# Altium PCB BOARD_ADS _V2.0 (3).PcbDoc
Units mm, origin at the board's own origin, x right, y up, seen from the top; angles counter-clockwise.
Board outline 93 x 70 mm, 2 copper layers (Top Layer, Bottom Layer); 49 components, 22 nets, 185 pads, 59 vias.
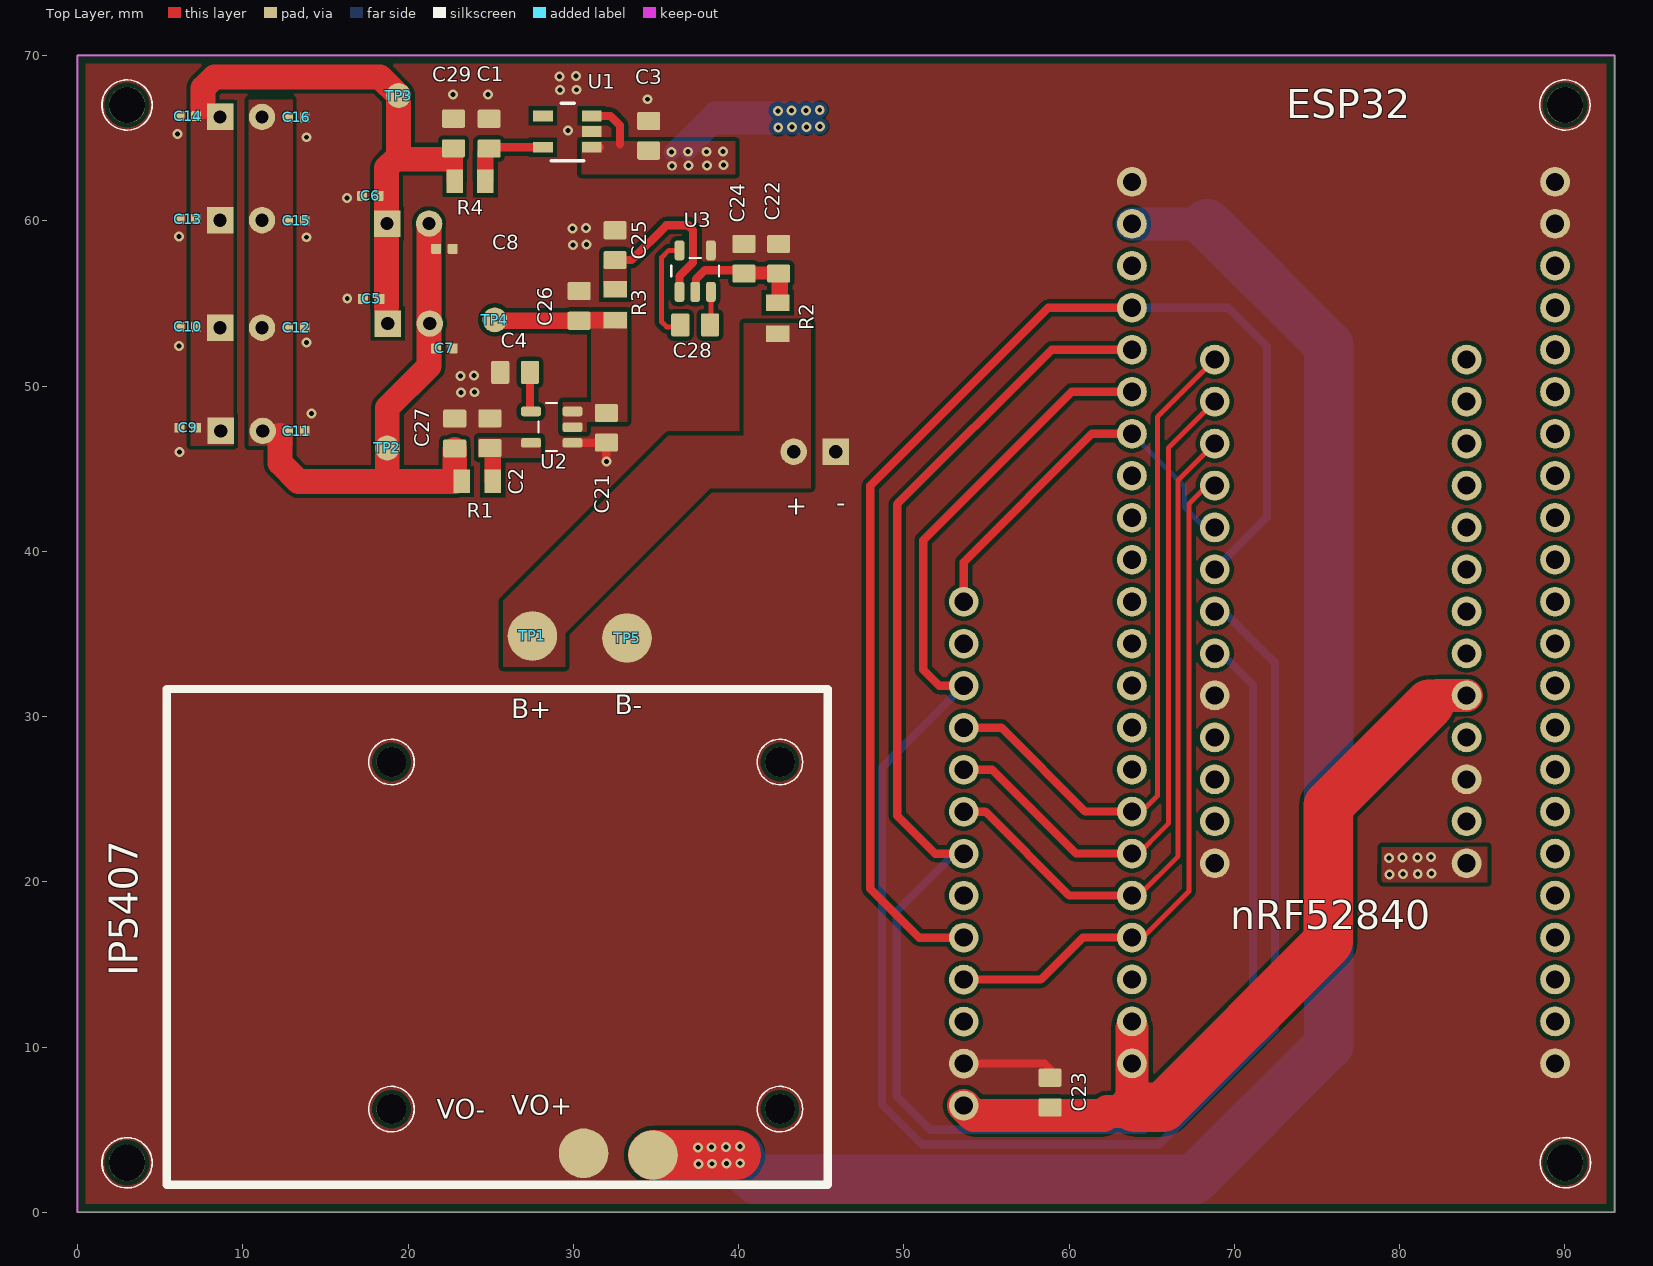
[diagram p0: Top Layer view]
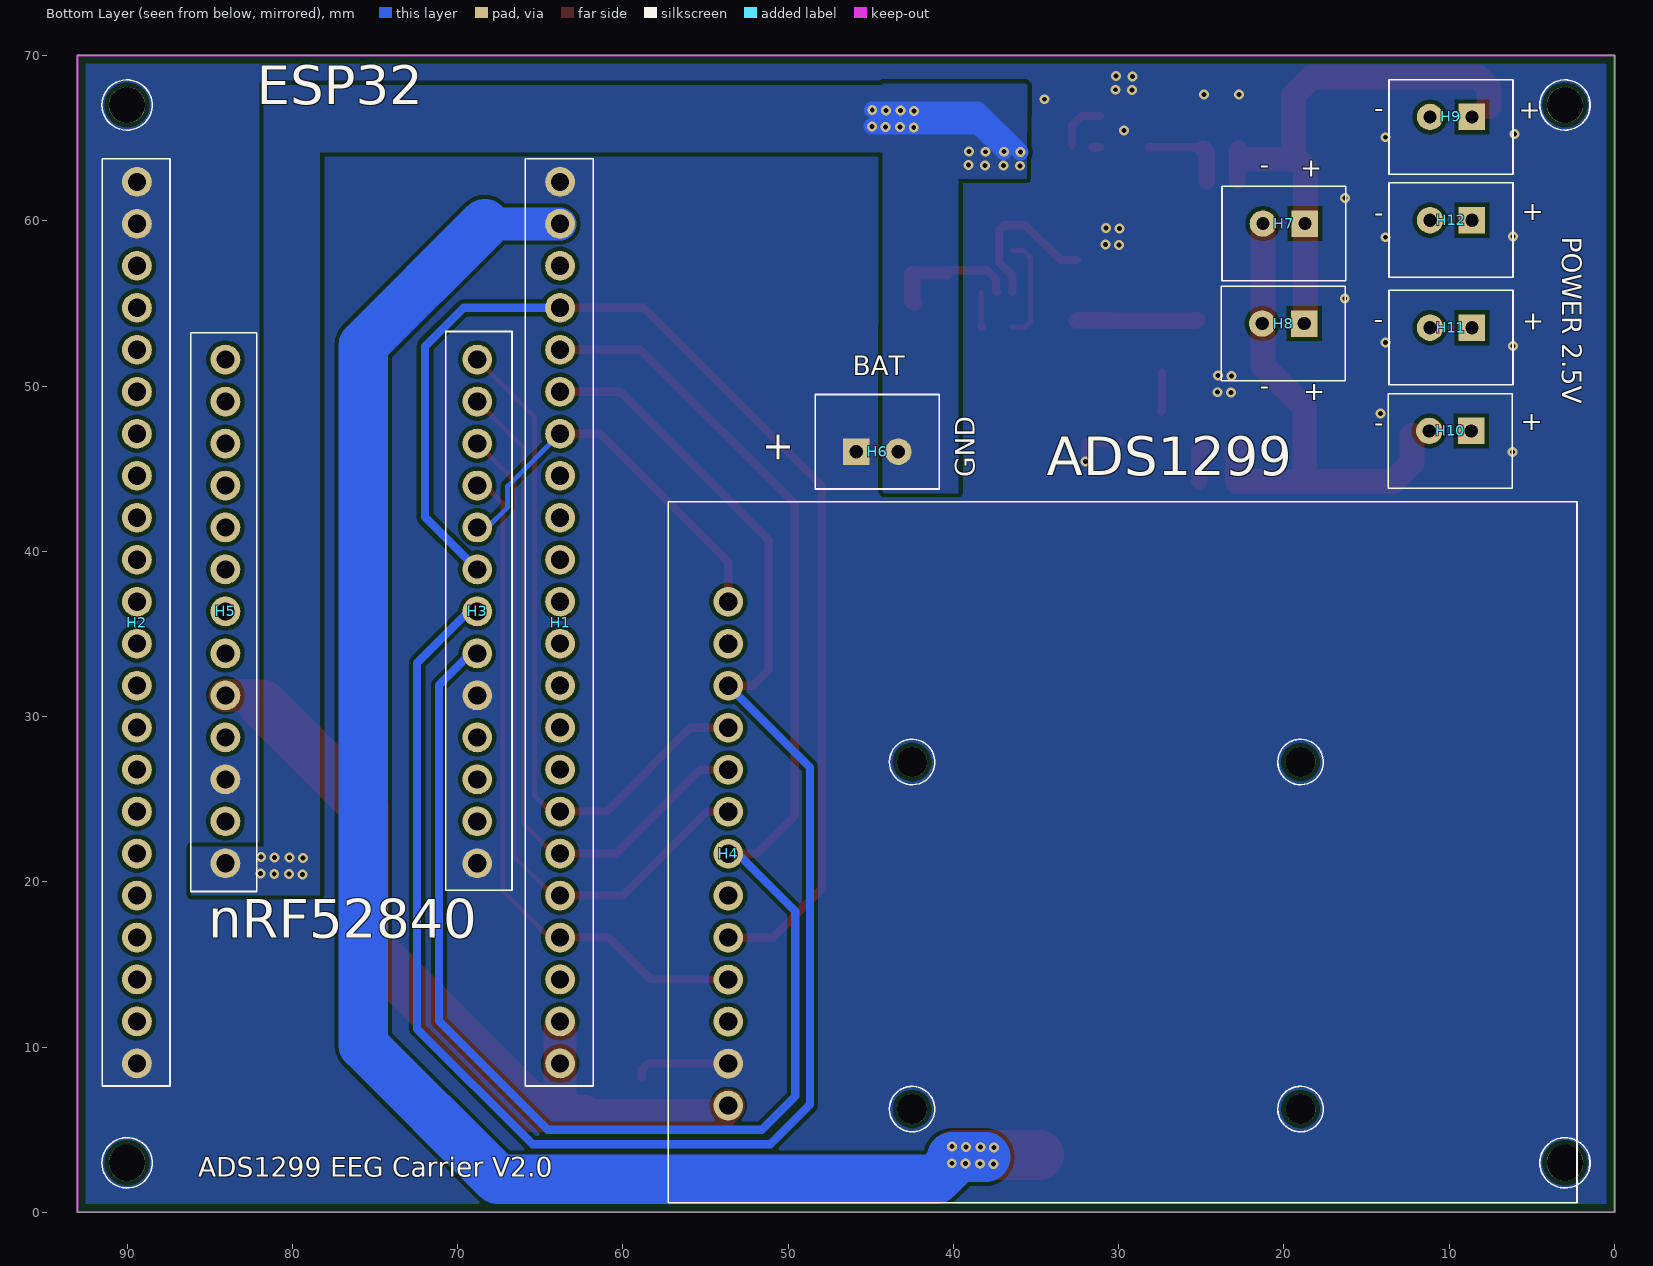
[diagram p1: Bottom Layer view, seen from below]
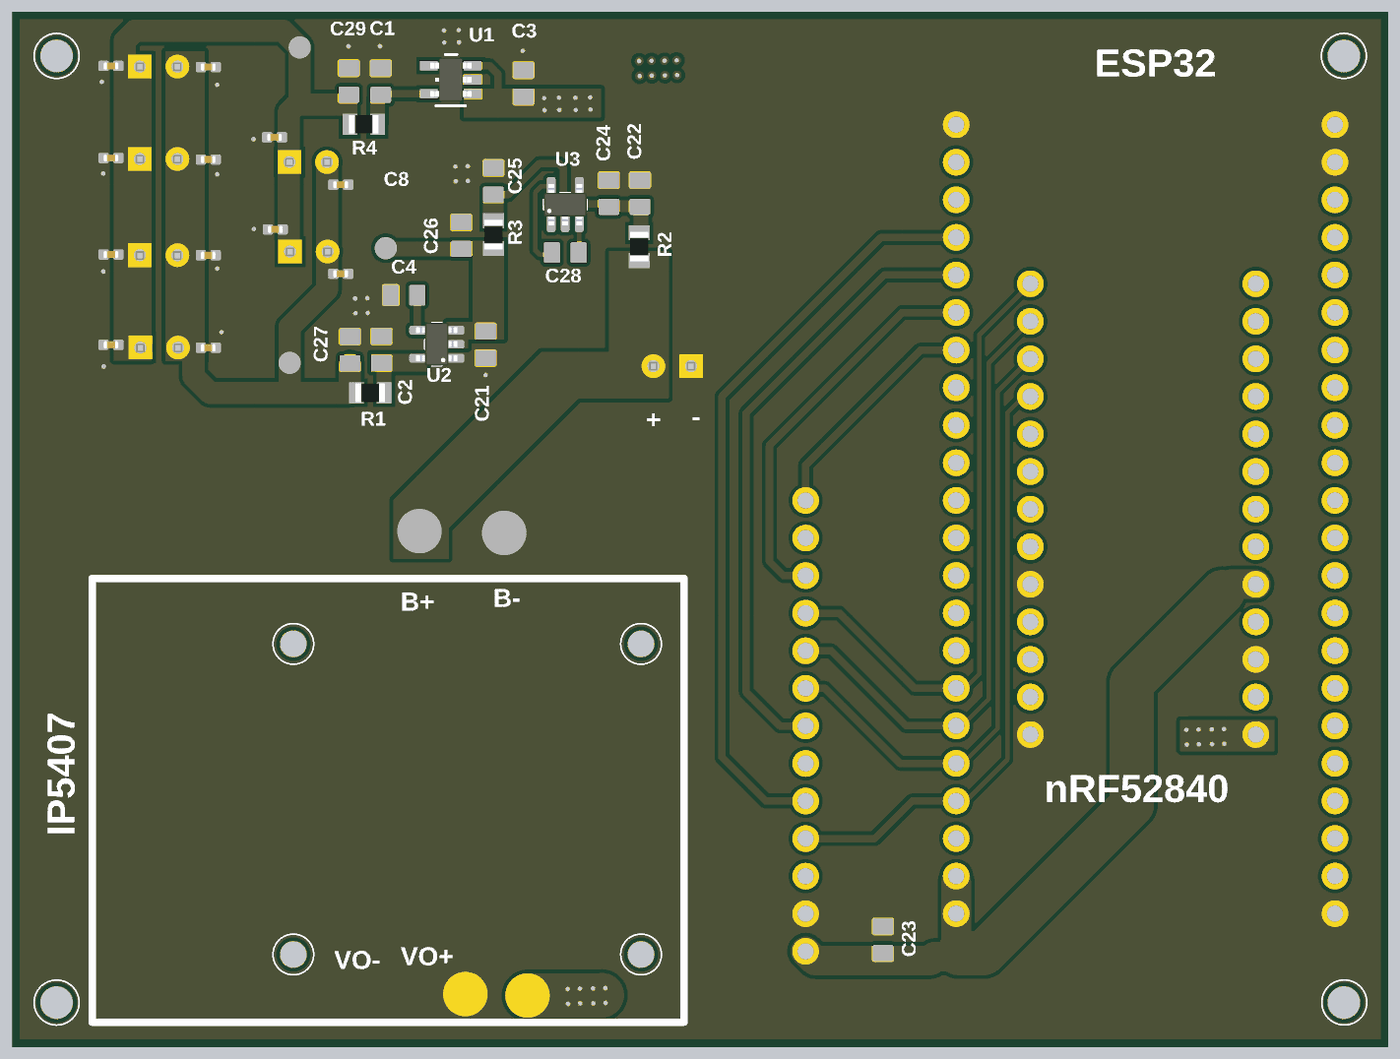
[diagram p2: 3D render of the assembled board from above, using the file's embedded part models]
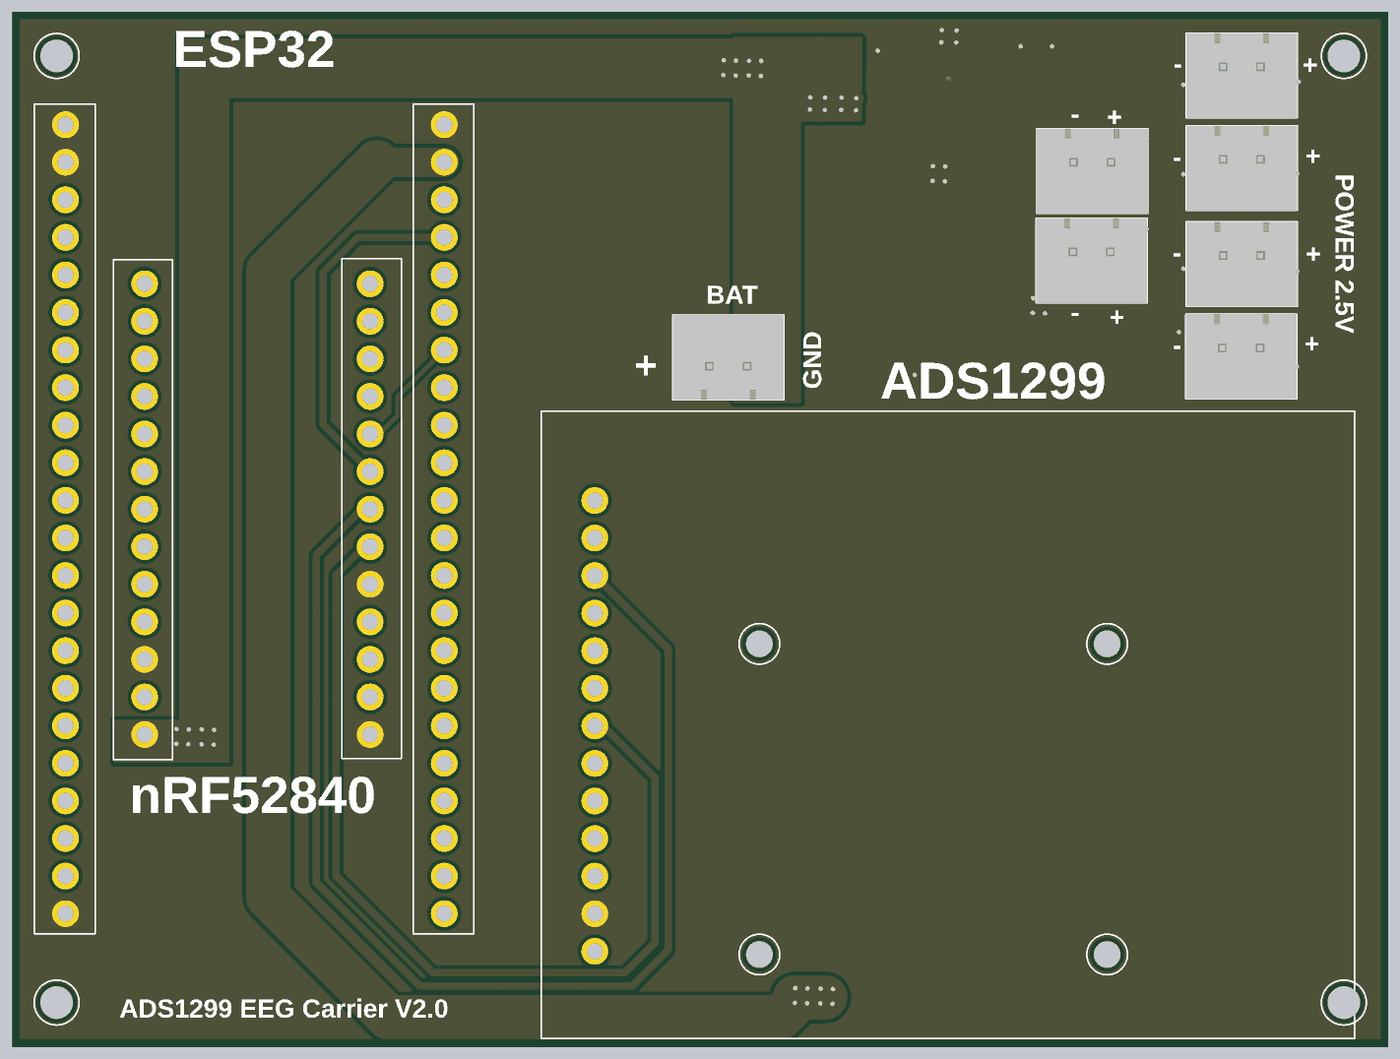
[diagram p3: 3D render of the assembled board from below, using the file's embedded part models]

## Layer stack, top to bottom
Top Solder: solder mask 0.0102, Solder Resist, Dk 3.5
Top Layer: signal copper 0.0356
Dielectric 1: dielectric 0.32, FR-4, Dk 4.8
Bottom Layer: signal copper 0.0356
Bottom Solder: solder mask 0.0102, Solder Resist, Dk 3.5

## Board outline
0,0 0,70 93,70 93,0

## Design rules (kind name [scope] priority, off if disabled: settings)
BoardOutlineClearance [All] p1: gap=0.5 ignorepadtopadclearanceinfootprint=FALSE
Clearance [All] p1: gap=0.254 ignorepadtopadclearanceinfootprint=FALSE except(0.25: Arc-Poly Arc-Region Track-Poly Track-Region SMDPad-Poly SMDPad-Region THPad-Poly THPad-Region Via-Poly Via-Region Fill-Poly Fill-Region Poly-Poly Poly-Region Region-Region; 0.6: Arc-Fill Track-Fill SMDPad-Fill THPad-Fill Via-Fill Fill-Fill)
MinimumSolderMaskSliver [All] p1: minsoldermaskwidth=0.15
PolygonConnect [All] p1: connectstyle=Direct reliefconductorwidth=0.254 reliefentries=4 polygonreliefangle="90 Angle" airgapwidth=0.254
RoutingVias [All] p1: holewidth=0.711 width=1.27 viastyle="Through Hole" minholewidth=0.3 minwidth=0.6 maxholewidth=0.711 maxwidth=1.27
SolderMaskExpansion [All] p1: expansion=0 istentingtop=FALSE
SupplyNets "Schematic Supply Nets_6" [InNet('VBAT_NEG')] p1: voltage=0.000
SupplyNets "Schematic Supply Nets" [InNet('VBAT')] p2: voltage=0.000
SupplyNets "Schematic Supply Nets_5" [InNet('GND')] p3: voltage=0.000
SupplyNets "Schematic Supply Nets_4" [InNet('2V5')] p4: voltage=0.000
SupplyNets "Schematic Supply Nets_3" [InNet('3V3')] p5: voltage=0.000
SupplyNets "Schematic Supply Nets_2" [InNet('-2V5')] p6: voltage=0.000
SupplyNets "Schematic Supply Nets_1" [InNet('5V')] p7: voltage=0.000
Width [All] p1: maxlimit=3 minlimit=0.254 preferedwidth=0.254
29 further rules are at their usual default settings.

## Components (designator, comment, footprint, x,y, rotation, side; value= is the part's Value field where it differs from the comment)
C1 "1uF" C0805L 24.907,65.266 r90 top
C2 "4.7uF" C0805L 24.955,47.141 r90 top
C3 "1uF" C0805L 34.559,65.139 r90 top
C4 "10nF" C0805L 26.479,50.824 r180 top
C5 "100nF" C0402L 17.775,55.275 r0 top
C6 "100nF" C0402L 17.725,61.5 r0 top
C7 "100nF" C0402L 22.2,52.275 r180 top
C8 "100nF" C0402L 22.2,58.3 r180 top
C9 "100nF" C0402L 6.675,47.475 r0 top
C10 "100nF" C0402L 6.675,53.575 r0 top
C11 "100nF" C0402L 13.25,47.275 r180 top
C12 "100nF" C0402L 13.25,53.525 r180 top
C13 "100nF" C0402L 6.675,60.1 r0 top
C14 "100nF" C0402L 6.675,66.325 r0 top
C15 "100nF" C0402L 13.25,60 r180 top
C16 "100nF" C0402L 13.25,66.25 r180 top
C21 "4.7uF" C0805L 32,47.475 r270 top
C22 "10uF" C0805L 42.425,57.7 r90 top
C23 "100nF" C0805L 58.85,7.25 r90 top
C24 "1uF" C0805L 40.325,57.7 r90 top
C25 "1uF" C0805L 32.525,58.525 r90 top
C26 "10uF" C0805L 30.35,54.85 r90 top
C27 "10uF" C0805L 22.825,47.125 r90 top
C28 "1uF" C0805L 37.375,53.7 r0 top
C29 "10uF" C0805L 22.75,65.275 r90 top
H1 "HEADER_22P" header_22p 63.8,62.352 r0 bottom
H2 "HEADER_22P" header_22p 89.4,62.352 r0 bottom
H3 "Header_13p" HEADER_13P 68.81,51.6 r0 bottom
H4 "MODULE ADS" "MODULE ADS1299" 53.625,21.705 r270 bottom
H5 "Header_13p" HEADER_13P 84.05,21.12 r180 bottom
H6 "Header 2P 2.54 Duc Thang" XH2.54M-2 45.875,46.025 r180 bottom
H7 "Header 2P 2.54 Duc Thang" XH2.54M-2 18.735,59.825 r0 bottom
H8 "Header 2P 2.54 Duc Thang" XH2.54M-2 18.775,53.775 r0 bottom
H9 "Header 2P 2.54 Duc Thang" XH2.54M-2 8.627,66.28 r0 bottom
H10 "Header 2P 2.54 Duc Thang" XH2.54M-2 8.667,47.28 r0 bottom
H11 "Header 2P 2.54 Duc Thang" XH2.54M-2 8.627,53.53 r0 bottom
H12 "Header 2P 2.54 Duc Thang" XH2.54M-2 8.627,60.03 r0 bottom
R1 "0R" R0805 24.2,44.225 r180 top
R2 "0R" R0805 42.375,54.1 r90 top
R3 "0R" R0805 32.525,54.925 r270 top
R4 "0R" R0805 23.75,62.375 r180 top
TP1 "TP_?" TP_SMD_1P50#1 27.525,34.875 r90 top
TP2 "TP_?" TP_SMD_1P50#2 18.75,46.25 r90 top
TP3 "TP_?" TP_SMD_1P50#2 19.432,67.575 r90 top
TP4 "TP_?" TP_SMD_1P50#2 25.25,54 r90 top
TP5 "TP_?" TP_SMD_1P50#1 33.25,34.75 r90 top
U1 "LP5907MFX-2.5/NOPB" DBV0005A_M 29.639,65.392 r180 top
U2 "TPS72325DBVR" SOT95P280X145-5N 28.695,47.511 r180 top
U3 "TPS60403DBVR" SOT95P280X145-5N 37.375,56.95 r90 top

## Footprints (in the part's own frame and the unit in brackets; to place one, negate y for a bottom-side part, rotate by r counter-clockwise, add the part's x,y. Pads: shape width x height; smd on the part's side, far side on the other; paste and mask are expansions set on the pad)
C0402L [mm]
  rrect20% 0.6x0.6 smd paste+0.05 mask+0.05: 1(-0.5,0) 2(0.5,0)
  body extent -0.5,-0.25 0.5,0.25, height 0.49
C0805L [mm]
  rrect20% 1.1x1.4 smd mask+0.05: 1(-0.9,0) 2(0.9,0)
  body extent -1.1,-0.72 1.1,0.72, height 1.1
DBV0005A_M [mm]
  rect 1.2x0.65 smd paste+0 mask+0.051: 1(-1.475,0.95) 2(-1.475,0) 3(-1.475,-0.95) 4(1.475,-0.95) 5(1.475,0.95)
  silkscreen extent -0.99,-1.71 0.99,1.77, body extent -1.4,-1.45 1.4,1.45, height 1.2
HEADER_13P [mm]
  round 1.8 hole 1.1 paste-2539.97: 1(0,0) 2(0,2.54) 3(0,5.08) 4(0,7.62) 5(0,10.16) 6(0,12.7) 7(0,15.24) 8(0,17.78) 9(0,20.32) 10(0,22.86) 11(0,25.4) 12(0,27.94) 13(0,30.48)
  silkscreen extent -2.1,-1.7 1.9,32.1
header_22p [mm]
  round 1.8 hole 1.1 paste-2539.97: 1(0,53.34) 2(0,50.8) 3(0,48.26) 4(0,45.72) 5(0,43.18) 6(0,40.64) 7(0,38.1) 8(0,35.56) 9(0,33.02) 10(0,30.48) 11(0,27.94) 12(0,25.4) 13(0,22.86) 14(0,20.32) 15(0,17.78) 16(0,15.24) 17(0,12.7) 18(0,10.16) 19(0,7.62) 20(0,5.08) 21(0,2.54) 22(0,0)
  silkscreen extent -2,-1.4 2.1,54.7
"MODULE ADS1299" [mm]
  round 1.8 hole 1.1 paste-2539.97: 1(15.24,0) 2(12.7,0) 3(10.16,0) 4(7.62,0) 5(5.08,0) 6(2.54,0) 7(0,0) 8(-2.54,0) 9(-5.08,0) 10(-7.62,0) 11(-10.16,0) 12(-12.7,0) 13(-15.24,0)
  silkscreen extent -21.29,-3.64 21.13,51.35, body extent -21.41,-3.56 21.54,51.37, height 9.7
R0805 [mm]
  rect 1x1.42 smd: 1(-0.935,0) 2(0.935,0)
  body extent -1,-0.63 1,0.63, height 0.6
SOT95P280X145-5N [mm]
  rrect50% 1.21x0.59 smd: 1(-1.255,0.95) 2(-1.255,0) 3(-1.255,-0.95) 4(1.255,-0.95) 5(1.255,0.95)
  silkscreen extent -0.33,-1.45 0.8,1.45, body extent -1.4,-1.45 1.4,1.45, height 1.45
TP_SMD_1P50#1 [mm] "Single 1.50 mm round top-layer copper test point for probing"
  round 3 smd: 1(0,0)
TP_SMD_1P50#2 [mm] "Single 1.50 mm round top-layer copper test point for probing"
  round 1.5 smd: 1(0,0)
XH2.54M-2 [mm]
  rect 1.6x1.6 hole 0.8: 1(0,0)
  round 1.6 hole 0.8: 2(2.54,0)
  silkscreen extent -2.48,-2.26 5.02,3.46, body extent -2.48,-2.28 5.02,3.46, height 6.91

## Part data
C1 C2 C3 C4 C5 C6 C7 C8 C9 C10 C11 C12 C13 C14 C15 C16 C21 C22 C23 C24 C25 C26 C27 C28 C29: library part C0805, "CAP 0402 MLCC NON-POLARIZED GENERIC; VALUE TOLERANCE VOLTAGE AND MPN SET ON INSTANCE", Case=0402, Value2=SET_VOLTAGE, Package=0402, Type=Capacitor
H4: library part MODULE_ADS, "Cắm", Chung_Loai=Cắm, Don_Vi=Con, Ma_Hang=MH007094, Ten_Linh_Kien="Header 10P XH2.54-10P Đực Cong"
H6 H7 H8 H9 H10 H11 H12: "Cắm", Chung_Loai=Cắm, Don_Vi=Con, Ma_Hang=MH001283, Ten_Linh_Kien="Header 2P XH2.54-2P Đực Thẳng"
R1 R2 R3 R4: library part R0805, "RES 0805 GENERIC; VALUE TOLERANCE POWER AND MPN SET ON INSTANCE", Case=0805, Value1=SET_VALUE, Package=0805, Type=Resistor
TP1 TP2 TP3 TP4 TP5: library part TEST_POINT, "TP SMD 1P PadDia_1.50mm ROUND COPPER TEST POINT"
U1: library part LP5907MFX-2.5NOPB, "250-mA, low-noise, high-PSRR, ultra-low-dropout voltage regulator with low IQ and enable 5-SOT-23 -40 to 125", Manufacturer_Name="Texas Instruments", Copyright="Copyright (C) 2026 Ultra Librarian. All rights reserved.", Manufacturer_Part_Number=LP5907MFX-2.5/NOPB, RefDes=RefDes, Type=TYPE
U2: "200-mA, negative, adjustable low-dropout voltage regulator with enable", Package="SOT-23-5 Texas Instruments", Check_prices=https://www.snapeda.com/parts/TPS72325DBVR/Texas+Instruments/view-part/?ref=eda, MF="Texas Instruments", MP=TPS72325DBVR, SnapEDA_Link=https://www.snapeda.com/parts/TPS72325DBVR/Texas+Instruments/view-part/?ref=snap
U3: "60mA Charge Pump Voltage Inverter with Fixed 250kHz Operation", Package="SOT-23-5 Texas Instruments", Check_prices=https://www.snapeda.com/parts/TPS60403DBVR/Texas+Instruments/view-part/?ref=eda, MF="Texas Instruments", MP=TPS60403DBVR, SnapEDA_Link=https://www.snapeda.com/parts/TPS60403DBVR/Texas+Instruments/view-part/?ref=snap

## Free pads (board coordinates)
  round 1.8 hole 1.8 paste-2539.97: 8(19,6.25) 8(19,27.25) 8(42.5,6.25) 8(42.5,27.25)
  round 2.2 hole 2.2 paste-2539.97: 9(3,3) 9(3,67) 9(90,3) 9(90,67)
  round 3 smd paste-2539.97: 12(30.625,3.575) 13(34.825,3.475)

## Via types
v1: diameter 0.6, hole 0.3, Top Layer to Bottom Layer, tented both sides, 59 vias

## Nets (pads, with @x,y where several pads share a name; then routed paths per layer and width w, separated by ;. In a path a pad name is that pad's centre, name@x,y a point inside that pad or via, vN(x,y) a via of type N, cw(c..) or ccw(c..) an arc to the next point about the centre after c; other vN are vias at no path point)
2V5: C5.2 C6.2 C9.2 C10.2 C13.2 C14.2 C29.1 H7.1 H8.1 H9.1 H10.1 H11.1 H12.1 R4.2 TP3.1 | length 31.9
  Top Layer w1: C29.1 22.815,64.31 R4.2
  Top Layer w1.5: 7.6,66.9 7.6,68.025 8.275,68.7 18.307,68.7 TP3.1 19.432,63.993 19.7,63.725 ; 18.7,54.775 18.7,63.2 19.225,63.725 19.7,63.725 ; 22.25,63.725 19.7,63.725
3V3: C23.1 H1.1 H1.2 H4.1 H5.5 | length 50.6
  Top Layer w2: H4.1 54.24,5.85 62.075,5.85 62.325,6.1 63.725,6.1 ; H1.2@63.8,11.155 63.8,8.615 63.8,6.525 63.975,6.35 ; 81.8,30.75 82.33,31.28 H5.5
  Top Layer w3: 63.975,6.35 65.65,6.35 75.675,16.375 75.675,24.625 81.8,30.75
5V: H1.21 pad.13 | length 103.7
  Top Layer w3: pad.13 39.825,3.475 39.85,3.5
  Bottom Layer w2: H1.21 68.363,59.812
  Bottom Layer w3: 38.05,3.35 40.1,3.35 ; v1(40.1,2.975) 41.075,2 67.575,2 75.7,10.125 75.7,52.475 68.363,59.812
  other v1: 37.563,2.919 38.388,2.944 39.275,2.95 37.538,3.919 38.363,3.944 39.25,3.95 40.075,3.975
-2V5: C7.2 C8.2 C11.2 C12.2 C15.2 C16.2 C27.1 H7.2 H8.2 H9.2 H10.2 H11.2 H12.2 R1.2 TP2.1 | length 31.3
  Top Layer w1.5: 12.25,47.025 12.25,45.35 13.375,44.225 18.75,44.225 ; H7.2 21.275,51.2 18.75,48.675 TP2.1 18.75,44.225 ; C27.1@22.825,46.15 22.825,44.225 18.75,44.225
CS: H1.16 H3.5 H4.13 | length 24.2
  Top Layer w0.5: H4.13 53.625,39.35 61.387,47.112 H1.16@64.124,47.112
  Bottom Layer w0.3: H1.16 66.975,43.937 66.975,42.675 68.21,41.44 H3.5
DRDY: H1.4 H3.4 H4.4 | length 41.6
  Top Layer w0.3: H1.4 64.457,16.632 67.25,19.425 67.25,42.875 68.355,43.98 H3.4
  Top Layer w0.5: H4.4 58.285,14.085 60.832,16.632 H1.4@64.124,16.632
GND: C1.2 C2.2 C3.2 C4.2 C5.1 C6.1 C7.1 C8.1 C9.1 C10.1 C11.1 C12.1 C13.1 C14.1 C15.1 C16.1 C21.2 C22.2 C23.2 C24.2 C25.2 C26.2 C27.2 C29.2 H1.22 H2.1 H2.21 H2.22 H3.9 H3.13 H4.2 H5.3 H6.1 pad.12 TP5.1 U1.2 U2.1 U3.4 | length 9.1
  Top Layer w0.5: U2.1 31.986,46.561 C21.2 v1(32,45.425) ; H4.2 58.495,9.005 58.85,8.65 C23.2
  other v1: 6.175,46 14.15,48.325 23.2,49.6 24.025,49.625 23.175,50.6 24,50.625 6.15,52.425 13.85,52.625 16.325,55.3 29.975,58.525 30.8,58.55 13.85,59 6.15,59.05 29.95,59.525 30.775,59.55 16.3,61.375 13.85,65.05 6.05,65.25 29.675,65.45 34.5,67.35 22.725,67.65 24.85,67.65 29.2,67.9 30.2,67.925 29.175,68.725 30.175,68.75
MISO: H1.19 H3.6 H4.5 | length 75.8
  Top Layer w0.5: H4.5 50.925,16.625 47.975,19.575 47.975,43.975 58.732,54.732 H1.19@64.124,54.732
  Bottom Layer w0.5: H1.19 69.643,54.732 71.975,52.4 71.975,42.065 H3.6
MOSI: H1.17 H3.7 H4.11 | length 109.5
  Top Layer w0.5: H4.11 52.135,31.865 51.175,32.825 51.175,40.675 60.152,49.652 H1.17@64.124,49.652
  Bottom Layer w0.5: H4.11 48.675,26.915 48.675,6.525 51.075,4.125 65.475,4.125 72.45,11.1 72.45,33.25 69.34,36.36 H3.7
NetC1_1: C1.1 R4.1 U1.5 | length 5.4
  Top Layer w0.5: C1.1 24.983,64.442 U1.5
  Top Layer w1: R4.1 24.685,64.144 C1.1
NetC2_1: C2.1 R1.1 U2.5 | length 2.1
  Top Layer w1: C2.1 25.135,46.061 R1.1
NetC4_1: C4.1 U2.4 | length 2.4
  Top Layer w0.5: C4.1 27.379,48.522 U2.4
NetC22_1: C22.1 C24.1 R2.2 U3.2 | length 7.8
  Top Layer w0.5: U3.2 37.42,55.74 37.42,56.47 37.95,57 40.265,57 C24.1@40.425,56.84
  Top Layer w0.8: C24.1@40.425,56.84 C22.1@42.4,56.84
  Top Layer w1: R2.2 42.49,55.15 C22.1@42.49,56.75
NetC25_1: C25.1 R3.1 U3.1 | length 9.8
  Top Layer w0.5: C25.1 33.525,57.625 35.625,59.725 36.95,59.725 37.25,59.425 37.25,57.474 36.425,56.649 U3.1
NetC28_1: C28.1 U3.5 | length 6.4
  Top Layer w0.3: U3.5 35.78,58.205 35.35,57.775 35.35,53.875 35.65,53.575 C28.1@36.475,53.575
NetC28_2: C28.2 U3.3 | length 2.1
  Top Layer w0.3: C28.2@38.325,53.625 U3.3
  Top Layer w0.5: C28.2@38.275,53.575 C28.2@38.325,53.625
PWDN: H1.7 H3.1 H4.10 | length 42.4
  Top Layer w0.3: H1.7 64.402,24.252 65.35,25.2 65.35,48.14 H3.1
  Top Layer w0.5: H4.10 55.9,29.325 60.973,24.252 H1.7@64.124,24.252
RESET: H1.6 H3.2 H4.9 | length 42.5
  Top Layer w0.3: H1.6@63.8,21.315 66,23.515 66,46.25 H3.2
  Top Layer w0.5: H4.9 55.34,26.785 60.413,21.712 H1.6@64.124,21.712
  Bottom Layer w1: H1.6@63.997,21.712 H1.6@64.124,21.712
SCLK: H1.18 H3.8 H4.7 | length 107.5
  Top Layer w0.5: H4.7 51.895,21.705 49.6,24 49.6,42.85 58.942,52.192 H1.18@64.124,52.192
  Bottom Layer w0.5: H4.7 53.055,21.705 49.575,18.225 49.575,7.025 51.592,5.008 64.558,5.008 71.125,11.575 71.125,31.9 69.205,33.82 H3.8
START: H1.5 H3.3 H4.8 | length 42.3
  Top Layer w0.3: H1.5 64.222,19.172 66.6,21.55 66.6,44.31 H3.3
  Top Layer w0.5: H4.8 54.93,24.245 60.003,19.172 H1.5@64.124,19.172
VBAT: C3.1 H5.1 H6.2 R2.1 TP1.1 U1.1 U1.3 | length 22.7
  Top Layer w0.5: U1.1 U1.1@31.6,64.442 ; U1.3 32.258,66.342 32.825,65.775 32.825,64.628
  Bottom Layer w1: v1(35.95,64.15) 38.506,66.706 v1(44.912,66.706) ; v1(36.95,64.175) 38.481,65.706 v1(44.937,65.706) ; H5.1@83.732,21.438 H5.1
  other v1: 79.381,20.438 80.206,20.463 81.093,20.469 81.918,20.494 79.356,21.438 80.181,21.463 81.068,21.469 81.893,21.494 35.975,63.325 36.975,63.35 38.087,63.349 39.087,63.374 38.062,64.174 39.062,64.199 42.4,65.65 43.225,65.675 44.112,65.681 42.375,66.65 43.2,66.675 44.087,66.681
VBAT_NEG: C21.1 C26.1 R3.2 TP4.1 U2.2 U2.3 | length 7.2
  Top Layer w1: TP4.1 25.3,53.95 C26.1 ; C26.1@30.41,53.99 R3.2
pads on no net: H1.3 H1.8 H1.9 H1.10 H1.11 H1.12 H1.13 H1.14 H1.15 H1.20 H2.2 H2.3 H2.4 H2.5 H2.6 H2.7 H2.8 H2.9 H2.10 H2.11 H2.12 H2.13 H2.14 H2.15 H2.16 H2.17 H2.18 H2.19 H2.20 H3.10 H3.11 H3.12 H4.3 H4.6 H4.12 H5.2 H5.4 H5.6 H5.7 H5.8 H5.9 H5.10 H5.11 H5.12 H5.13 U1.4

## Polygon pours and split planes (outlines as drawn)
GND on Top Layer "GND_L01_P015" (solid, remove dead copper, pour order 15): 0,70 0,40.048 0,-0.01 92.992,-0.01 93,-0.002 93,69.948
-2V5 on Top Layer "-2V5_L01_P036" (solid, remove dead copper, pour order 36): 10.35,67.325 10.35,46.375 13.025,46.375 13.025,67.325
2V5 on Top Layer "2V5_L01_P035" (solid, remove dead copper, pour order 35): 6.85,67.1 6.85,46.4 9.425,46.4 9.425,67.1
VBAT on Top Layer "VBAT_L01_P030" (solid, remove dead copper, pour order 30): 44.35,47 44.35,43.825 38.275,43.825 29.5,35.05 29.5,33 25.75,33 25.75,37 35.75,47
NetC25_1 on Top Layer "NETC25_1_L01_P029" (solid, remove dead copper, pour order 29): 31.825,57.3 33.225,57.3 33.225,56.05 31.825,56.05
VBAT on Top Layer "VBAT_L01_P028" (solid, remove dead copper, pour order 28): 83.955,22.124 85.299,22.124 85.3,22.125 85.3,19.975 78.911,19.975 78.925,22.1
VBAT_NEG on Top Layer "VBAT_NEG_L01_P010" (solid, remove dead copper, pour order 10): 33.25,54.5 33.25,47.825 31.1,47.825 31.1,54.5
VBAT on Top Layer "VBAT_L01_P004" (solid, remove dead copper, pour order 4): 30.5,64.8 30.5,62.825 39.8,62.825 39.8,64.8
VBAT on Top Layer "VBAT_L01_P005" (solid, pour order 5): 40.325,43.85 44.375,43.85 44.375,53.8 40.325,53.8
NetC2_1 on Top Layer "NETC2_1_L01_P002" (solid, remove dead copper, pour order 2): 24.25,46.875 28.025,46.875 28.025,45.65 24.25,45.65
VBAT_NEG on Top Layer "VBAT_NEG_L01_P001" (solid, remove dead copper, pour order 1): 32.475,47.825 30.8,47.825 30.8,47.225 29.35,47.225 29.35,49.025 32.475,49.025
GND on Bottom Layer "GND_L02_P013" (solid, remove dead copper, pour order 13): 0,70 0,40.048 0,-0.01 92.992,-0.01 93,-0.002 93,69.948
VBAT on Bottom Layer "VBAT_L02_P026" (solid, remove dead copper, pour order 26): 86.125,22.125 86.125,19.225 86.1,19.2 80.9,19.2 78.325,19.2 78.325,64.15 41.9,64.15 41.9,68.2 81.725,68.2 81.725,22.125
VBAT on Bottom Layer "VBAT_L02_P003" (solid, remove dead copper, pour order 3): 35.523,68.3 44.274,68.3 44.285,43.525 39.7,43.525 39.7,62.55 35.575,62.55

## Keep-outs
Keep-Out Layer:
  the board outline again, w0.1

## Silkscreen, mask and mechanical layers (free items; w line width, h text height)
Top Overlay:
  circle w0.1: c42.5,27.25 r1.375
  circle w0.1: c42.5,6.25 r1.375
  circle w0.1: c19,6.25 r1.375
  circle w0.1: c19,27.25 r1.375
  circle w0.1: c90,67 r1.521
  circle w0.1: c90.028,3.008 r1.521
  circle w0.1: c3,3 r1.521
  circle w0.1: c3,67 r1.521
  lines w0.5: 5.4,1.675 45.4,1.675 45.4,31.675 5.4,31.675 5.4,1.675
  text "ESP32" at 73.15,65.611 h3
  text "-" at 45.925,42.007 h2
  text "+" at 42.825,41.815 h2
  text "B-" at 32.5,29.75 h2
  text "B+" at 26.25,29.5 h2
  text "nRF52840" at 69.75,16.561 h3
  text "IP5407" at 4.214,14.275 h3 r90
  text "VO+" at 26.25,5.524 h2
  text "VO-" at 21.75,5.274 h2
Bottom Overlay:
  circle w0.1: c90,67 r1.521
  circle w0.1: c90,3 r1.521
  circle w0.1: c3,3 r1.521
  circle w0.1: c3,67 r1.521
  lines w0.1: 20.375,6.25 cw(c19,6.25) 20.375,6.281 ; 20.375,27.25 cw(c19,27.25) 20.375,27.281 ; 43.875,6.25 cw(c42.5,6.25) 43.875,6.281 ; 43.875,27.25 cw(c42.5,27.25) 43.875,27.281
  text "ESP32" at 82.15,66.248 h4
  text "-" at 14.525,65.857 h2
  text "+" at 5.8,65.79 h2
  text "-" at 21.458,62.464 h2
  text "+" at 19.025,62.265 h2
  text "+" at 5.6,59.64 h2
  text "-" at 14.55,59.557 h2
  text "POWER 2.5V" at 3.551,59.025 h2 r90
  text "-" at 14.565,53.096 h2
  text "+" at 5.575,53.015 h2
  text "BAT" at 46.1,50.25 h2
  text "-" at 21.458,49.064 h2
  text "+" at 18.848,48.737 h2
  text "+" at 5.675,46.94 h2
  text "-" at 14.55,46.832 h2
  text "+" at 49.297,45.3 h3 r270
  text "GND" at 38.324,44.475 h2 r270
  text "ADS1299" at 34.35,43.823 h4
  text "nRF52840" at 85.075,15.823 h4
  text "ADS1299 EEG Carrier V2.0" at 85.703,1.772 h2